# Altium PCB K601-6252双模带屏 VER 1.1 2026 10 16.PcbDoc (part 1 of 12)
Units mm, origin at the board's own origin, x right, y up, seen from the top; angles counter-clockwise.
Board outline 75.02 x 25.73 mm, 2 copper layers (Top Layer, Bottom Layer); 43 components, 67 nets, 219 pads, 157 vias.
Unrouted connection lines stored in the file: 1.
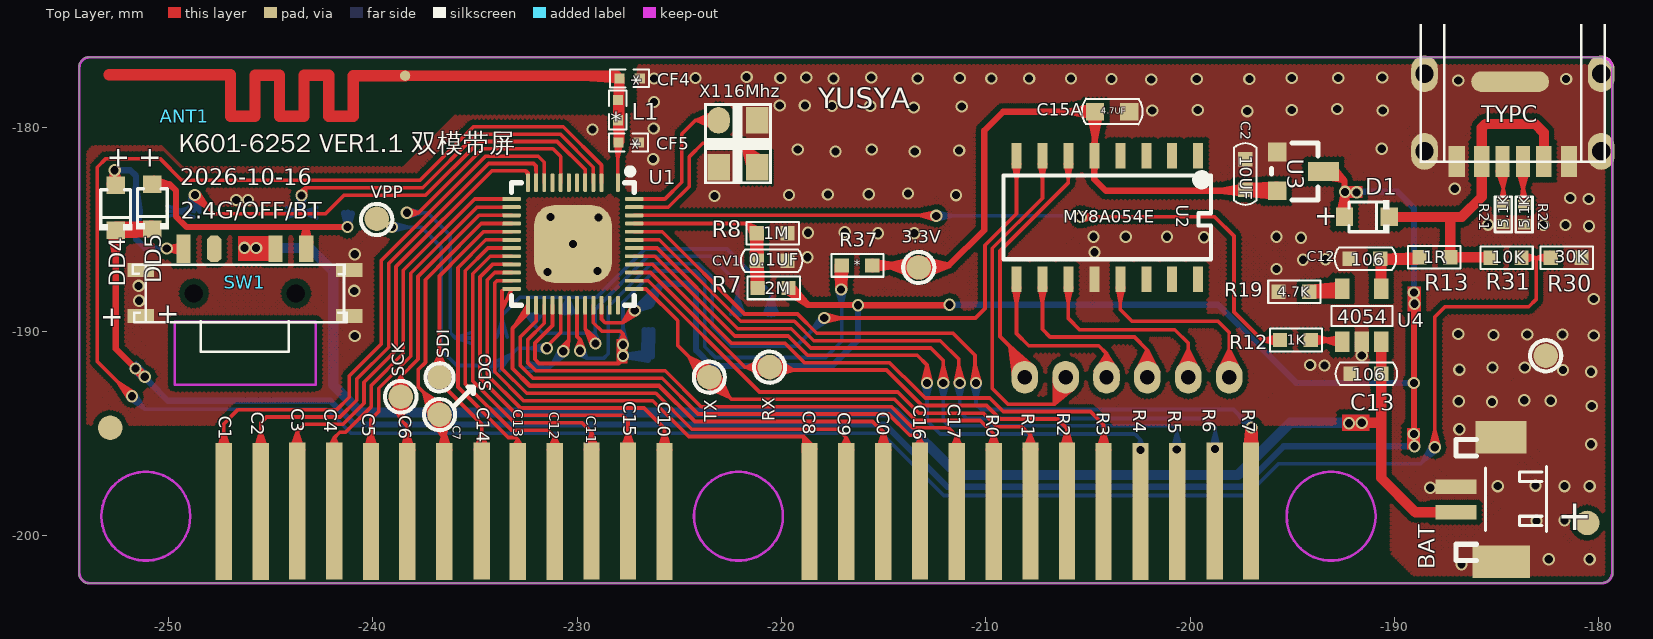
[diagram p0: Top Layer view]
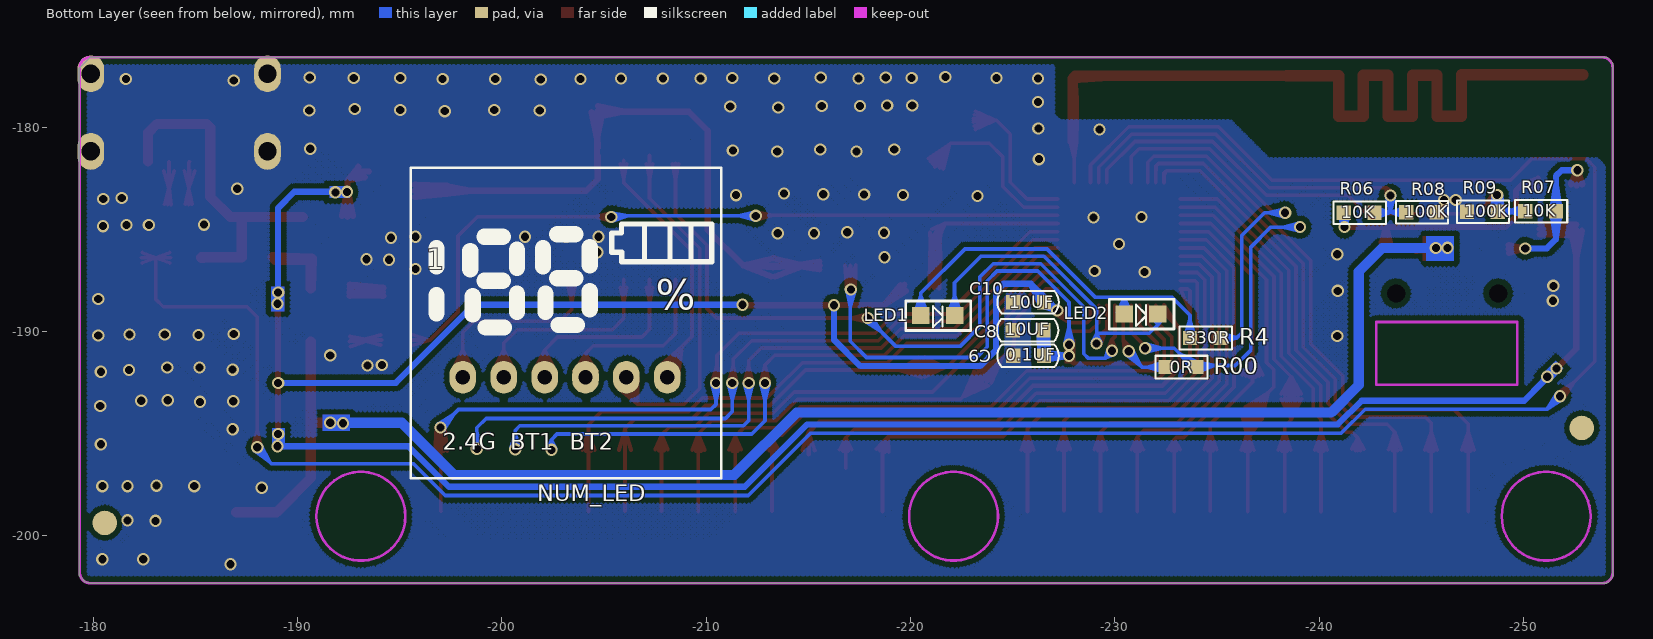
[diagram p1: Bottom Layer view, seen from below]

## Layer stack, top to bottom
Top Layer: signal copper 0.0356
Dielectric: dielectric 0.32, FR-4, Dk 4.8
Bottom Layer: signal copper 0.0356

## Board outline
-179.85,-202.316 -179.856,-202.323 -253.85,-202.323 -254.05,-202.323 -254.225,-202.148 -254.35,-202.023 -254.35,-201.148 -254.35,-176.872 -254.1,-176.623 -254.07,-176.593 -253.85,-176.593 -179.843,-176.593 -179.35,-177.086 -179.325,-177.111 -179.325,-178.964 -179.325,-201.973 -179.6,-202.248

## Design rules (kind name [scope] priority, off if disabled: settings)
Clearance GND [All] p1: gap=0.25
Clearance [All] p2: gap=0.18
PolygonConnect [All] p1: connectstyle=Direct reliefconductorwidth=0.254 reliefentries=4 polygonreliefangle="90 Angle" airgapwidth=0.254
RoutingVias [All] p1: holewidth=0.4 width=0.6 viastyle="Through Hole" minholewidth=0.4 minwidth=0.6 maxholewidth=0.4 maxwidth=0.6
SolderMaskExpansion [All] p1: expansion=0.102
Width [All] p1: maxlimit=0.5 minlimit=0.18 preferedwidth=0.5
28 further rules are at their usual default settings.

## Components (designator, comment, footprint, x,y, rotation, side; value= is the part's Value field where it differs from the comment)
* "L1" 0402 -228,-178.673 r270 bottom
* "CF4" 0402 -227.925,-177.623 r0 bottom
* "CF5" 0402 -227.975,-180.758 r0 bottom
ANT1 "Comment" ANT2 -249.2,-179.473 r270 top
BAT "$$$1" $$$1 -185.54,-198.223 r90 top
C2 "10UF" 0603CC#1 -197.3,-183.076 r270 top
C8 "10UF" 0603CC#1 -226.5,-189.948 r180 bottom
C9 "0.1UF" 0603CC#1 -226.525,-191.198 r180 bottom
C10 "10UF" 0603CC#1 -226.525,-188.573 r180 bottom
C12 "106" 0603cC -192.2,-186.448 r180 top
C13 "106" 0603cC -192.15,-192.073 r180 top
C15A "4.7UF" 0603CC#2 -202.975,-179.248 r90 top
CV1 "0.1UF" 0603CC#1 -219.7,-186.548 r0 top
D1 "SOD-323_L1.7-W1.3-LS2.7-RD" SOD-323_L1.7-W1.3-LS2.7-RD -191.35,-184.398 r180 top (schematic designator D3)
DD4 "SOD-323_L1.7-W1.3-LS2.7-RD" SOD-323_L1.7-W1.3-LS2.7-RD -252.575,-183.948 r90 top (schematic designator D3)
DD5 "SOD-323_L1.7-W1.3-LS2.7-RD" SOD-323_L1.7-W1.3-LS2.7-RD -250.775,-183.898 r90 top (schematic designator D3)
LED1 "Comment" LED0603 -222.15,-189.223 r180 bottom
LED2 "Comment" LED0603 -232.1,-189.148 r180 bottom
NUM_LED "Comment" "PCBComponent_1 - duplicate"#1 -184.406,-188.305 r180 bottom
R00 "0R" 0603RR -232.475,-191.748 r0 bottom
R4 "330R" 0603RR -233.666,-190.323 r0 bottom
R06 "10K" 0603RR -241.2,-184.198 r0 bottom
R7 "2M" 0603RR -221.15,-187.873 r180 top
R07 "10K" 0603RR -250.075,-184.123 r0 bottom
R8 "1M" 0603RR -221.2,-185.198 r180 top
R08 "100K" 0603RR -244.25,-184.173 r0 bottom
R09 "100K" 0603RR -247.225,-184.143 r0 bottom
R12 "1K" 0603RR -195.6,-190.423 r180 top
R13 "1R" 0603rR -187.275,-186.373 r0 top
R19 "4.7K" 0603RR -195.675,-188.063 r180 top
R21 "5.1K" SR0402 -184.675,-184.273 r90 top
R22 "5.1K" SR0402 -183.65,-184.282 r90 top
R30 "30K" 0603rR -182.35,-186.398 r180 top
R31 "10K" 0603rR -185.287,-186.398 r180 top
R37 "*" 0603RR -217.05,-186.773 r180 top
SW1 "SW-1P3T" SW-1P3T -246.253,-188.147 r180 top
TYPC "" USB -184.21,-179.17 r0 top locked
U1 "" QFN48-6*6 -230.2,-185.723 r0 top (schematic designator U4)
U2 "MY8A054E" SOP16L -204.05,-184.023 r270 top
U3 "SOT23" SOT23 -194.75,-182.173 r270 top
U4 "4054" SOT-23-5 -192.55,-190.498 r0 top
X1 "16Mhz" 3225 -222.125,-180.823 r90 top
? "Comment" "PCBComponent_1 - duplicate"#2 -227.18,-186.856 r0 top locked

## Footprints (in the part's own frame and the unit in brackets; to place one, negate y for a bottom-side part, rotate by r counter-clockwise, add the part's x,y. Pads: shape width x height; smd on the part's side, far side on the other; paste and mask are expansions set on the pad)
0402 [mm]
  rect 0.5x0.5 smd far side: 1(1,0) 2(0,0)
0603CC#1 [mm]
  rect 0.7x0.7 smd: 1(0,0) 2(-1.5,0)
  silkscreen extent -2.28,-0.55 0.73,0.55
0603CC#2 [mm]
  rect 0.85x0.9 smd: 1(0,0) 2(0,1.676)
  silkscreen extent -0.63,-0.66 0.64,2.32
0603cC [mm]
  rect 0.7x0.7 smd: 1(0,0) 2(-1.5,0)
  silkscreen extent -2.28,-0.55 0.73,0.55
0603RR [mm]
  rect 0.7x0.7 smd: 1(0,0) 2(-1.5,0)
  silkscreen extent -2.06,-0.55 0.5,0.55
0603rR [mm]
  rect 0.7x0.7 smd: 1(0,0) 2(-1.5,0)
  silkscreen extent -2.06,-0.55 0.5,0.55
3225 [mm]
  rect 1.3x1.1 smd: 0(-1.15,0.95) 0(1.15,-0.95) 2(-1.15,-0.95)
  oval 1.3x1.1 smd: 1(1.15,0.95)
  silkscreen extent -1.97,-1.66 2,1.66
$$$1 [mm]
  rect 0.7x2 smd: GND(0.625,1.45) VCC(-0.625,1.45)
  rect 1.6x2.8 smd: GND/2(-3.048,-0.762)
  rect 1.6x2.5 smd: GND/3(3.048,-0.762)
  silkscreen extent -2.99,-2.97 2.92,1.45
ANT2 [mm]
  Top Layer lines w0.55: -2.032,-3.7 -2.032,2.247 ; -2,2.247 0,2.247 0,3.447 -2,3.447 -2,4.647 0,4.647 0,5.847 -2,5.847 -2,7.047 0,7.047 0,8.247 -1.981,8.247 -1.981,10.791
LED0603 [mm]
  rect 0.85x0.85 smd: 1(-1.65,0) 2(0,0)
  silkscreen extent -2.39,-0.74 0.79,0.71
"PCBComponent_1 - duplicate"#1 [mm]
  oval 1.3x1.6 hole 0.7: 1(13.685,-3.937) 2(15.685,-3.937) 3(17.685,-3.937) 4(19.685,-3.937) 5(21.685,-3.937) 5(21.685,-3.937) 6(23.685,-3.937)
  silkscreen extent 11.12,-8.89 26.32,6.31
"PCBComponent_1 - duplicate"#2 [mm]
  rect 0.8x6.7 smd: 1(-20.097,-11.958) 1(-18.288,-11.958) 1(-16.51,-11.938) 1(-14.705,-11.938) 1(-12.901,-11.958) 1(-11.119,-11.958) 1(-9.313,-11.958) 1(-7.488,-11.938) 1(-5.715,-11.958) 1(-3.911,-11.958) 1(-2.107,-11.938) 1(-0.323,-11.924) 1(1.465,-11.958) 1(8.559,-11.958) 1(10.361,-11.958) 1(12.167,-11.958) 1(13.962,-11.938) 1(15.767,-11.958) 1(17.567,-11.958) 1(19.368,-11.938) 1(21.16,-11.938) 1(22.946,-11.958) 1(24.756,-11.958) 1(26.543,-11.958) 1(28.389,-11.938) 1(30.162,-11.938)
  Keep-Out Layer circle w0.127: c5.08,-12.192 r2.175
QFN48-6*6 [mm]
  rrect50% 0.19x0.9 smd paste-100 mask+0.051: 1(2.2,3) 3(1.4,3) 4(1,3) 5(0.6,3) 6(0.2,3) 7(-0.2,3) 8(-0.6,3) 9(-1,3) 10(-1.4,3) 11(-1.8,3) 12(-2.2,3) 25(-2.2,-3) 26(-1.8,-3) 27(-1.4,-3) 28(-1,-3) 29(-0.6,-3) 30(-0.2,-3) 31(0.2,-3) 32(0.6,-3) 33(1,-3) 34(1.4,-3) 35(1.8,-3) 36(2.2,-3)
  rrect50% 0.9x0.19 smd paste-100 mask+0.051: 13(-3,2.2) 14(-3,1.8) 15(-3,1.4) 16(-3,1) 17(-3,0.6) 18(-3,0.2) 19(-3,-0.2) 20(-3,-0.6) 21(-3,-1) 22(-3,-1.4) 23(-3,-1.8) 24(-3,-2.2) 37(3,-2.2) 38(3,-1.8) 39(3,-1.4) 40(3,-1) 41(3,-0.6) 42(3,-0.2) 43(3,0.2) 44(3,0.6) 45(3,1) 46(3,1.4) 47(3,1.8) 48(3,2.2)
  rrect50% 3.8x3.8 smd paste-100 mask+0.051: 49(0.001,-0.001)
  silkscreen extent -3,-3 3,3.7
SOD-323_L1.7-W1.3-LS2.7-RD [mm]
  rect 0.845x0.9 smd paste+0 mask+0.051: 1(-1.098,0) 2(1.098,0)
  silkscreen extent -1.1,-0.8 0.88,0.8
SOP16L [mm]
  rect 1.25x0.49 smd: 1(-2.625,4.445) 2(-2.625,3.175) 3(-2.625,1.905) 4(-2.625,0.635) 5(-2.625,-0.635) 6(-2.625,-1.905) 7(-2.625,-3.175) 8(-2.625,-4.445) 9(3.425,-4.445) 10(3.425,-3.175) 11(3.425,-1.905) 12(3.425,-0.635) 13(3.425,0.635) 14(3.425,1.905) 15(3.425,3.175) 16(3.425,4.445)
  silkscreen extent -1.65,-5.08 2.45,5.08
SOT23 [mil]
  rect 36x36 smd: 1(-37.5,-39) 2(37.5,-39)
  rect 36x60 smd: 3(0,50)
  silkscreen extent -55,-50 55,40
SOT-23-5 [mm]
  rect 0.7x1 smd: 1(0,0) 2(0.95,0) 3(1.9,0) 4(1.9,2.59) 5(0,2.59)
  silkscreen extent -0.54,0.75 2.46,1.75
SR0402 [mm]
  rect 0.5x0.6 smd: 1(-0.475,0) 2(0.475,0)
  silkscreen extent -0.86,-0.41 0.86,0.41
SW-1P3T [mm]
  rect 1.3x0.7 smd: 0(5.1,1.1) 0/2(-5.1,1.1) 0/3(5.1,-1.15) 0/4(-5.1,-1.15)
  rect 0.7x1.3 smd: 1(-3,-2.181) 2(-1.5,-2.181)
  oct 0.7x1.3 smd: 3(1.5,-2.181)
  rect 0.7x1.4 smd: 8(3,-2.181)
  round 0.7 hole 0.9: 9(-2.5,0) 10(2.5,0)
  silkscreen extent -4.98,-1.4 5.49,2.85
USB [mm]
  oval 1.3x1.8 hole 0.9: 1(-4.32,-2.023) 1(-4.32,1.777) 1(4.32,1.777) 1(4.32,-2.023)
  rect 0.8x1.524 smd: 1(-2.75,-2.523) 6(2.75,-2.523)
  oval 3.81x1 smd: 1(-0.129,1.391)
  rect 0.76x1.524 smd: 2(-1.52,-2.523) 5(1.52,-2.523)
  rect 0.7x1.524 smd: 3(-0.5,-2.523) 4(0.5,-2.523)
  silkscreen extent -4.5,-2.52 4.5,4.38

## Part data
U1: library part "BYC6625 QFN48"

## Free pads (board coordinates)
  round 0.5 smd: 3(-238.409,-177.491)
  round 1.2 smd far side: ""(-252.845,-194.725) ""(-180.57,-199.373) ""(-150.845,-194.962) ""(-150.845,-12.298) ""(0.755,-193.682) ""(0.775,-9.8)
  round 1.2 smd: ""(-252.845,-194.723) ""(-239.8,-184.495) ""(-238.625,-193.198) ""(-236.725,-194.075) ""(-236.725,-192.25) ""(-223.525,-192.242) ""(-220.575,-191.748) ""(-213.275,-186.873) ""(-182.6,-191.193) ""(-180.57,-199.373) ""(-150.85,-12.3) ""(-150.845,-194.977) ""(0.75,-193.684) ""(0.775,-9.8)

## Via types
v1: diameter 0.6, hole 0.4, Top Layer to Bottom Layer, tented both sides, 154 vias
v2: diameter 0.6, hole 0.4, Top Layer to Bottom Layer, 3 vias

## Nets (pads, with @x,y where several pads share a name; then routed paths per layer and width w, separated by ;. In a path a pad name is that pad's centre, name@x,y a point inside that pad or via, vN(x,y) a via of type N, cw(c..) or ccw(c..) an arc to the next point about the centre after c; other vN are vias at no path point)
2.4G: DD4.2 R07.2 SW1.8 | length 71
  Top Layer w0.305: DD4.2@-252.869,-182.809 v1(-252.625,-182.116) ; DD4.2@-252.869,-182.809 v1(-252.625,-182.116) ; DD4.2@-252.869,-182.809 v1(-252.625,-182.116) ; DD4.2@-252.869,-182.809 v1(-252.625,-182.116) ; DD4.2@-252.869,-182.809 v1(-252.625,-182.116) ; DD4.2@-252.869,-182.809 v1(-252.625,-182.116) ; DD4.2@-252.84,-182.797 v1@-252.575,-182.166 ; DD4.2@-252.84,-182.797 v1(-252.625,-182.116) ; DD4.2@-252.84,-182.797 v1@-252.575,-182.166 ; DD4.2@-252.84,-182.797 v1@-252.575,-182.166 ; DD4.2@-252.84,-182.797 v1@-252.575,-182.166 ; DD4.2@-252.84,-182.797 v1(-252.625,-182.116) ; DD4.2@-252.84,-182.797 v1(-252.625,-182.116) ; DD4.2@-252.84,-182.797 v1(-252.625,-182.116) ; DD4.2@-252.84,-182.797 v1(-252.625,-182.116) ; DD4.2@-252.84,-182.797 v1(-252.625,-182.116) ; v1(-252.625,-182.116) v1@-252.575,-182.166 ; v1(-252.625,-182.116) DD4.2@-252.575,-182.85 ; v1(-252.625,-182.116) DD4.2@-252.31,-182.797 ; v1(-252.625,-182.116) DD4.2@-252.339,-182.792 ; v1(-252.625,-182.116) DD4.2@-252.603,-182.85 ; v1(-252.625,-182.116) DD4.2@-252.339,-182.792 ; v1(-252.625,-182.116) DD4.2@-252.603,-182.85 ; v1(-252.625,-182.116) DD4.2@-252.339,-182.792 ; v1(-252.625,-182.116) DD4.2@-252.603,-182.85 ; v1(-252.625,-182.116) DD4.2@-252.575,-182.85 ; v1(-252.625,-182.116) DD4.2@-252.31,-182.797 ; v1(-252.625,-182.116) DD4.2@-252.31,-182.797 ; v1(-252.625,-182.116) DD4.2@-252.31,-182.797 ; v1(-252.625,-182.116) DD4.2@-252.575,-182.85 ; v1(-252.625,-182.116) DD4.2@-252.31,-182.797 ; v1(-252.625,-182.116) DD4.2@-252.575,-182.85 ; DD4.2@-252.575,-182.85 v1@-252.575,-182.166 ; DD4.2@-252.575,-182.85 v1@-252.575,-182.166 ; DD4.2@-252.575,-182.85 v1@-252.575,-182.166 ; v1@-252.575,-182.166 DD4.2@-252.31,-182.797 ; v1@-252.575,-182.166 DD4.2@-252.31,-182.797 ; v1@-252.575,-182.166 DD4.2@-252.31,-182.797 ; v1@-252.575,-182.166 DD4.2@-252.31,-182.797 ; v1(-250.075,-185.939) -249.28,-185.939 SW1.8@-249.253,-185.966 ; v1(-250.075,-185.939) SW1.8@-249.283,-186.161 ; v1(-250.075,-185.939) SW1.8@-249.27,-185.769 ; v1(-250.075,-185.939) SW1.8@-249.253,-185.966 ; v1(-250.075,-185.939) SW1.8@-249.283,-186.161 ; v1(-250.075,-185.939) SW1.8@-249.27,-185.769 ; v1(-250.075,-185.939) SW1.8@-249.253,-185.966 ; v1(-250.075,-185.939) SW1.8@-249.283,-186.161 ; v1(-250.075,-185.939) SW1.8@-249.27,-185.769 ; v1(-250.075,-185.939) SW1.8@-249.253,-185.966 ; v1(-250.075,-185.939) SW1.8@-249.283,-186.161 ; v1(-250.075,-185.939) SW1.8@-249.27,-185.769 ; v1(-250.075,-185.939) SW1.8@-249.253,-185.966 ; v1(-250.075,-185.939) SW1.8@-249.283,-186.161 ; v1(-250.075,-185.939) SW1.8@-249.27,-185.769
  Bottom Layer w0.305: v1(-252.625,-182.116) -251.857,-182.116 -251.575,-182.398 R07.2@-251.575,-184.123 ; v1(-250.075,-185.939) -251.134,-185.939 -251.575,-185.498 R07.2@-251.575,-184.123 ; R07.2@-251.772,-184.138 -251.575,-185.387 ; R07.2@-251.772,-184.138 -251.575,-185.387 ; R07.2@-251.772,-184.138 -251.575,-185.387 ; R07.2@-251.772,-184.138 -251.575,-185.387 ; R07.2@-251.772,-184.107 -251.575,-182.858 ; R07.2@-251.772,-184.107 -251.575,-182.858 ; R07.2@-251.772,-184.107 -251.575,-182.858 ; R07.2@-251.772,-184.107 -251.575,-182.858 ; -251.575,-185.387 R07.2@-251.378,-184.138 ; -251.575,-185.387 R07.2@-251.378,-184.138 ; -251.575,-185.387 R07.2@-251.378,-184.138 ; -251.575,-185.387 R07.2@-251.575,-184.123 ; -251.575,-185.387 R07.2@-251.378,-184.138 ; -251.575,-185.387 R07.2@-251.575,-184.123 ; R07.2@-251.575,-184.123 -251.575,-182.858 ; R07.2@-251.575,-184.123 -251.575,-182.858 ; -251.575,-182.858 R07.2@-251.378,-184.107 ; -251.575,-182.858 R07.2@-251.378,-184.107 ; -251.575,-182.858 R07.2@-251.378,-184.107 ; -251.575,-182.858 R07.2@-251.378,-184.107
"5V LVD": R30.1 R31.2 U1.3 | length 179
  Top Layer w0.18: U1.3@-228.8,-182.723 -228.8,-181.864 ; -252.454,-192.491 v1@-251.936,-193.304 ; -252.454,-192.491 v1@-251.641,-193.009 ; -252.454,-192.491 v1@-251.936,-193.304 ; -252.454,-192.491 v1@-251.641,-193.009 ; -252.454,-192.491 v1(-251.773,-193.173) ; -252.454,-192.491 v1@-251.936,-193.304 ; -252.454,-192.491 v1@-251.641,-193.009 ; -252.454,-192.491 v1(-251.773,-193.173) ; -252.454,-192.491 v1@-251.936,-193.304 ; -252.454,-192.491 v1@-251.641,-193.009 ; v1(-251.773,-193.173) -253.475,-191.47 -253.475,-181.973 -253.049,-181.546 -250.404,-181.546 -249.337,-182.613 -237.695,-182.613 -235.07,-179.988 -230.676,-179.988 -228.8,-181.864 ; U1.3@-228.8,-182.368 -228.8,-181.864 ; U1.3@-228.8,-182.368 -228.8,-181.864 ; U1.3@-228.8,-182.368 -228.8,-181.864 ; v1@-188.233,-195.646 -188.025,-194.833 ; v1@-188.233,-195.646 -188.025,-194.833 ; v1@-188.233,-195.646 -188.025,-194.833 ; v1@-188.233,-195.646 -188.025,-194.833 ; v1(-188.025,-195.673) -188.025,-189.298 -187.525,-188.798 -183.425,-188.798 -183.069,-188.441 -183.069,-186.398 ; v1(-188.025,-195.673) -188.025,-194.833 ; v1(-188.025,-195.673) -188.025,-194.833 ; -188.025,-194.833 v1@-187.817,-195.646 ; -188.025,-194.833 v1@-187.817,-195.646 ; -188.025,-194.833 v1@-187.817,-195.646 ; -188.025,-194.833 v1@-187.817,-195.646 ; R31.2@-183.787,-186.398 -183.069,-186.398 ; R31.2@-183.787,-186.398 -183.069,-186.398 ; R31.2@-183.787,-186.398 -183.069,-186.398 ; R31.2@-183.74,-186.653 -183.069,-186.398 ; R31.2@-183.74,-186.653 -183.069,-186.398 ; R31.2@-183.74,-186.653 -183.069,-186.398 ; R31.2@-183.74,-186.653 -183.069,-186.398 ; R31.2@-183.74,-186.142 -183.069,-186.398 ; R31.2@-183.74,-186.142 -183.069,-186.398 ; R31.2@-183.74,-186.142 -183.069,-186.398 ; R31.2@-183.74,-186.142 -183.069,-186.398 ; -183.069,-186.398 R30.1@-182.35,-186.398 ; -183.069,-186.398 R30.1@-182.397,-186.653 ; -183.069,-186.398 R30.1@-182.397,-186.142 ; -183.069,-186.398 R30.1@-182.397,-186.653 ; -183.069,-186.398 R30.1@-182.397,-186.142 ; -183.069,-186.398 R30.1@-182.397,-186.653 ; -183.069,-186.398 R30.1@-182.397,-186.142 ; -183.069,-186.398 R30.1@-182.35,-186.398 ; -183.069,-186.398 R30.1@-182.397,-186.653 ; -183.069,-186.398 R30.1@-182.397,-186.142 ; -183.069,-186.398 R30.1@-182.35,-186.398
  Bottom Layer w0.18: v1@-251.903,-193.337 -251.132,-193.813 ; v1@-251.903,-193.337 -251.132,-193.813 ; v1@-251.903,-193.337 -251.132,-193.813 ; v1@-251.903,-193.337 -251.132,-193.813 ; v1(-251.773,-193.173) -251.132,-193.813 ; v1(-251.773,-193.173) -251.132,-193.813 ; v1(-251.773,-193.173) -251.132,-193.813 ; v1@-251.608,-193.042 -251.132,-193.813 ; v1@-251.608,-193.042 -251.132,-193.813 ; v1@-251.608,-193.042 -251.132,-193.813 ; v1@-251.608,-193.042 -251.132,-193.813 ; -251.132,-193.813 -242.239,-193.813 -241.075,-194.977 -215.11,-194.977 -212.06,-198.027 -197.234,-198.027 -195.679,-196.473 -188.725,-196.473 -188.025,-195.773 v1(-188.025,-195.673) ; -188.64,-196.388 v1@-187.882,-195.826 ; -188.64,-196.388 v1@-188.199,-195.554 ; -188.64,-196.388 v1(-188.025,-195.673) ; -188.64,-196.388 v1@-187.882,-195.826 ; -188.64,-196.388 v1@-188.199,-195.554 ; -188.64,-196.388 v1(-188.025,-195.673) ; -188.64,-196.388 v1@-187.882,-195.826 ; -188.64,-196.388 v1@-188.199,-195.554 ; -188.64,-196.388 v1(-188.025,-195.673) ; -188.64,-196.388 v1@-187.882,-195.826 ; -188.64,-196.388 v1@-188.199,-195.554 ; -188.64,-196.388 v1(-188.025,-195.673) ; -188.635,-196.382 v1@-187.882,-195.827 ; -188.635,-196.382 v1@-188.199,-195.554 ; -188.635,-196.382 v1(-188.025,-195.673)
"54E CTRL": U1.31 U2.8 | length 88.1
  Top Layer w0.18: U1.31@-230,-188.723 -230,-190.248 -229.85,-190.398 ; v1@-229.85,-190.923 -229.85,-190.398 ; U2.8@-208.495,-181.923 -208.495,-184.243 -210.035,-185.783 -210.035,-188.883 -210.5,-189.348 v1(-217.9,-189.348) ; v1@-230.056,-190.908 -229.85,-190.398 ; v1@-230.056,-190.908 -229.85,-190.398 ; v1@-230.056,-190.908 -229.85,-190.398 ; v1@-230.056,-190.908 -229.85,-190.398 ; v1@-230.056,-190.908 -229.85,-190.398 ; -230,-189.713 U1.31@-230,-189.078 ; -230,-189.713 U1.31@-230,-189.078 ; -230,-189.713 U1.31@-230,-189.078 ; v1(-229.85,-190.948) -229.85,-190.398 ; v1(-229.85,-190.948) -229.85,-190.398 ; v1(-229.85,-190.948) -229.85,-190.398 ; v1(-229.85,-190.948) -229.85,-190.398 ; -229.85,-190.398 v1@-229.644,-190.908 ; -229.85,-190.398 v1@-229.644,-190.908 ; -229.85,-190.398 v1@-229.644,-190.908 ; -229.85,-190.398 v1@-229.644,-190.908 ; -229.85,-190.398 v1@-229.644,-190.908 ; v1(-217.9,-189.348) -217.06,-189.348 ; v1(-217.9,-189.348) -217.06,-189.348 ; v1@-217.874,-189.556 -217.06,-189.348 ; v1@-217.874,-189.556 -217.06,-189.348 ; v1@-217.874,-189.556 -217.06,-189.348 ; v1@-217.874,-189.556 -217.06,-189.348 ; v1@-217.874,-189.139 -217.06,-189.348 ; v1@-217.874,-189.139 -217.06,-189.348 ; v1@-217.874,-189.139 -217.06,-189.348 ; v1@-217.874,-189.139 -217.06,-189.348 ; U2.8@-208.649,-181.793 -208.495,-182.563 ; U2.8@-208.649,-181.793 -208.495,-182.563 ; U2.8@-208.649,-181.793 -208.495,-182.563 ; U2.8@-208.649,-181.793 -208.495,-182.563 ; U2.8@-208.649,-181.793 -208.495,-182.563 ; -208.495,-182.563 U2.8@-208.341,-181.793 ; -208.495,-182.563 U2.8@-208.495,-181.778 ; -208.495,-182.563 U2.8@-208.341,-181.793 ; -208.495,-182.563 U2.8@-208.495,-181.778 ; -208.495,-182.563 U2.8@-208.341,-181.793 ; -208.495,-182.563 U2.8@-208.495,-181.778 ; -208.495,-182.563 U2.8@-208.341,-181.793 ; -208.495,-182.563 U2.8@-208.495,-181.778 ; -208.495,-182.563 U2.8@-208.341,-181.793 ; -208.495,-182.563 U2.8@-208.495,-181.778
  Bottom Layer w0.18: v1@-229.85,-190.998 -229.525,-191.323 ; v1@-229.976,-191.116 -229.525,-191.323 ; v1@-229.976,-191.116 -229.525,-191.323 ; v1@-229.976,-191.116 -229.525,-191.323 ; v1@-229.976,-191.116 -229.525,-191.323 ; v1@-229.976,-191.116 -229.525,-191.323 ; v1(-229.85,-190.948) -229.525,-191.323 ; v1(-229.85,-190.948) -229.525,-191.323 ; v1(-229.85,-190.948) -229.525,-191.323 ; v1(-229.85,-190.948) -229.525,-191.323 ; v1@-229.666,-190.847 -229.525,-191.323 ; v1@-229.666,-190.847 -229.525,-191.323 ; v1@-229.666,-190.847 -229.525,-191.323 ; v1@-229.666,-190.847 -229.525,-191.323 ; v1@-229.666,-190.847 -229.525,-191.323 ; -229.525,-191.323 -228.7,-191.323 -228.475,-191.098 -228.475,-188.791 -226.372,-186.688 -224.042,-186.688 -223.375,-187.354 -223.375,-189.773 -222.413,-190.734 -219.287,-190.734 v1(-217.9,-189.348) ; -218.582,-190.029 v1@-217.769,-189.511 ; -218.582,-190.029 v1@-218.064,-189.216 ; -218.582,-190.029 v1(-217.9,-189.348) ; -218.582,-190.029 v1@-217.769,-189.511 ; -218.582,-190.029 v1@-218.064,-189.216 ; -218.582,-190.029 v1(-217.9,-189.348) ; -218.582,-190.029 v1@-217.769,-189.511 ; -218.582,-190.029 v1@-218.064,-189.216 ; -218.582,-190.029 v1(-217.9,-189.348) ; -218.582,-190.029 v1@-217.769,-189.511 ; -218.582,-190.029 v1@-218.064,-189.216 ; -218.582,-190.029 v1(-217.9,-189.348) ; -218.582,-190.029 v1@-217.769,-189.511 ; -218.582,-190.029 v1@-218.064,-189.216 ; -218.582,-190.029 v1(-217.9,-189.348)
$$$1: LED1.1 LED2.1 R4.1 | length 76.8
  Bottom Layer w0.18: R4.1@-233.923,-190.285 -233.666,-189.433 ; R4.1@-233.923,-190.285 -233.666,-189.433 ; R4.1@-233.923,-190.285 -233.666,-189.433 ; R4.1@-233.923,-190.285 -233.666,-189.433 ; R4.1@-233.666,-190.323 -233.666,-189.215 -232.773,-188.323 -230.475,-188.323 ; R4.1@-233.666,-190.323 -233.666,-189.433 ; R4.1@-233.666,-190.323 -233.666,-189.433 ; -233.666,-189.433 R4.1@-233.408,-190.285 ; -233.666,-189.433 R4.1@-233.408,-190.285 ; -233.666,-189.433 R4.1@-233.408,-190.285 ; -233.666,-189.433 R4.1@-233.408,-190.285 ; LED2.1@-230.778,-189.077 -230.45,-188.348 ; LED2.1@-230.778,-189.077 -230.45,-188.348 ; LED2.1@-230.778,-189.077 -230.45,-188.348 ; LED2.1@-230.778,-189.077 -230.45,-188.348 ; LED2.1@-230.778,-189.077 -230.45,-188.348 ; LED2.1@-230.778,-189.077 -230.45,-188.348 ; LED2.1@-230.604,-189.133 -230.45,-188.348 ; LED2.1@-230.604,-189.133 -230.45,-188.348 ; LED2.1@-230.604,-189.133 -230.45,-188.348 ; LED2.1@-230.604,-189.133 -230.45,-188.348 ; LED2.1@-230.604,-189.133 -230.45,-188.348 ; LED2.1@-230.604,-189.133 -230.45,-188.348 ; -230.475,-188.323 -229.025,-188.323 -226.67,-185.968 -222.655,-185.968 -220.5,-188.123 LED1.1@-220.5,-189.223 ; -230.475,-188.323 -230.45,-188.348 ; LED2.1@-230.45,-189.148 -230.45,-188.348 ; LED2.1@-230.45,-189.148 -230.45,-188.348 ; LED2.1@-230.45,-189.148 -230.45,-188.348 ; LED2.1@-230.45,-189.148 -230.45,-188.348 ; LED2.1@-230.45,-189.148 -230.45,-188.348 ; -230.45,-188.348 LED2.1@-230.122,-189.077 ; -230.45,-188.348 LED2.1@-230.296,-189.133 ; -230.45,-188.348 LED2.1@-230.122,-189.077 ; -230.45,-188.348 LED2.1@-230.296,-189.133 ; -230.45,-188.348 LED2.1@-230.122,-189.077 ; -230.45,-188.348 LED2.1@-230.296,-189.133 ; -230.45,-188.348 LED2.1@-230.122,-189.077 ; -230.45,-188.348 LED2.1@-230.296,-189.133 ; -230.45,-188.348 LED2.1@-230.122,-189.077 ; -230.45,-188.348 LED2.1@-230.296,-189.133 ; -230.45,-188.348 LED2.1@-230.122,-189.077 ; -230.45,-188.348 LED2.1@-230.296,-189.133 ; LED1.1@-220.83,-189.164 -220.5,-188.258 ; LED1.1@-220.83,-189.164 -220.5,-188.258 ; LED1.1@-220.83,-189.164 -220.5,-188.258 ; LED1.1@-220.83,-189.164 -220.5,-188.258 ; LED1.1@-220.83,-189.164 -220.5,-188.258 ; LED1.1@-220.83,-189.164 -220.5,-188.258 ; LED1.1@-220.655,-189.21 -220.5,-188.258 ; LED1.1@-220.655,-189.21 -220.5,-188.258 ; LED1.1@-220.655,-189.21 -220.5,-188.258 ; LED1.1@-220.655,-189.21 -220.5,-188.258 ; LED1.1@-220.655,-189.21 -220.5,-188.258 ; LED1.1@-220.655,-189.21 -220.5,-188.258 ; LED1.1@-220.5,-189.223 -220.5,-188.258 ; LED1.1@-220.5,-189.223 -220.5,-188.258 ; LED1.1@-220.5,-189.223 -220.5,-188.258 ; LED1.1@-220.5,-189.223 -220.5,-188.258 ; -220.5,-188.258 LED1.1@-220.17,-189.164 ; -220.5,-188.258 LED1.1@-220.346,-189.21 ; -220.5,-188.258 LED1.1@-220.17,-189.164 ; -220.5,-188.258 LED1.1@-220.346,-189.21 ; -220.5,-188.258 LED1.1@-220.17,-189.164 ; -220.5,-188.258 LED1.1@-220.346,-189.21 ; -220.5,-188.258 LED1.1@-220.17,-189.164 ; -220.5,-188.258 LED1.1@-220.346,-189.21 ; -220.5,-188.258 LED1.1@-220.17,-189.164 ; -220.5,-188.258 LED1.1@-220.346,-189.21 ; -220.5,-188.258 LED1.1@-220.17,-189.164 ; -220.5,-188.258 LED1.1@-220.346,-189.21
+5V: C12.2 R13.2 U4.4 | length 38.3
  Top Layer w0.5: R13.2@-188.851,-186.376 C12.2@-190.7,-186.448 ; R13.2@-188.847,-186.377 C12.2@-190.7,-186.448 ; C12.2@-190.7,-186.448 U4.4@-190.65,-187.908 ; C12.2@-190.7,-186.448 R13.2@-188.9,-186.498 ; C12.2@-190.7,-186.448 U4.4@-190.65,-187.758 ; C12.2@-190.7,-186.448 U4.4@-190.65,-187.908 ; C12.2@-190.7,-186.448 U4.4@-190.65,-187.758 ; C12.2@-190.7,-186.448 R13.2@-188.9,-186.498 ; C12.2@-190.7,-186.448 U4.4@-190.65,-187.758 ; C12.2@-190.7,-186.448 U4.4@-190.65,-187.758 ; C12.2@-190.7,-186.448 U4.4@-190.65,-187.758 ; C12.2@-190.7,-186.448 U4.4@-190.65,-187.758 ; C12.2@-190.65,-186.449 R13.2@-188.775,-186.373 ; C12.2@-190.65,-186.449 R13.2@-188.775,-186.373 ; C12.2@-190.65,-186.449 R13.2@-188.775,-186.373 ; U4.4@-190.65,-187.908 C12.2@-190.65,-186.498 ; U4.4@-190.65,-187.758 C12.2@-190.65,-186.498 ; U4.4@-190.65,-187.758 C12.2@-190.65,-186.498 ; U4.4@-190.65,-187.758 C12.2@-190.65,-186.498 ; C12.2@-190.65,-186.498 R13.2@-188.9,-186.498 ; R13.2@-188.9,-186.498 R13.2@-188.775,-186.373 ; R13.2@-188.775,-186.373 -190.647,-186.498 R13.2@-188.775,-186.373 ; R13.2@-188.775,-186.373 -190.624,-186.445 R13.2@-188.775,-186.373
A5: R22.2 TYPC.4 | length 27.1
  Top Layer w0.18: TYPC.4@-183.71,-181.693 -183.71,-183.563 R22.2@-183.5,-183.773 ; TYPC.4@-183.967,-182.143 -183.71,-182.995 ; TYPC.4@-183.967,-182.143 -183.71,-182.995 ; TYPC.4@-183.967,-182.143 -183.71,-182.995 ; TYPC.4@-183.967,-182.143 -183.71,-182.995 ; TYPC.4@-183.967,-182.143 -183.71,-182.995 ; R22.2@-183.81,-183.803 -183.71,-182.97 ; R22.2@-183.81,-183.803 -183.71,-182.97 ; R22.2@-183.81,-183.803 -183.711,-182.985 ; -183.711,-182.985 -183.492,-183.779 -183.706,-183.018 -183.81,-183.802 -183.706,-182.984 ; -183.711,-182.985 R22.2@-183.65,-183.807 ; -183.71,-182.995 TYPC.4@-183.452,-182.143 ; -183.71,-182.995 TYPC.4@-183.71,-182.105 ; -183.71,-182.995 TYPC.4@-183.452,-182.143 ; -183.71,-182.995 TYPC.4@-183.71,-182.105 ; -183.71,-182.995 TYPC.4@-183.452,-182.143 ; -183.71,-182.995 TYPC.4@-183.71,-182.105 ; -183.71,-182.995 TYPC.4@-183.452,-182.143 ; -183.71,-182.995 TYPC.4@-183.71,-182.105 ; -183.71,-182.995 TYPC.4@-183.452,-182.143 ; -183.71,-182.995 TYPC.4@-183.71,-182.105 ; -183.71,-182.97 R22.2@-183.492,-183.78 ; -183.71,-182.97 R22.2@-183.65,-183.807 ; -183.71,-182.97 R22.2@-183.492,-183.78 ; -183.71,-182.97 R22.2@-183.65,-183.807 ; -183.706,-182.984 R22.2@-183.492,-183.781 ; -183.706,-182.984 R22.2@-183.65,-183.807
ANT: *.1@-228,-179.673 *.2 pad.3 U1.1 | length 88.6
  Top Layer w0.18: U1.1@-228,-182.723 -228,-180.783 *.2@-227.975,-180.758 ; *.2@-228.135,-180.769 -228,-181.549 ; *.2@-228.135,-180.769 -228,-181.549 ; *.2@-228.135,-180.769 -228,-181.549 ; *.2@-228.135,-180.769 -228,-181.549 ; *.2@-228.135,-180.769 -228,-181.547 *.2@-227.816,-180.779 ; U1.1@-228,-182.368 -228,-181.733 ; U1.1@-228,-182.368 -228,-181.733 ; U1.1@-228,-182.368 -228,-181.733 ; -228,-181.549 *.2@-227.816,-180.779 ; -228,-181.549 *.2@-227.975,-180.758 ; -228,-181.549 *.2@-227.816,-180.779 ; -228,-181.549 *.2@-227.975,-180.758 ; -228,-181.549 *.2@-227.816,-180.779 ; -228,-181.549 *.2@-227.975,-180.758 ; -228,-181.549 *.2@-227.816,-180.779 ; -228,-181.549 *.2@-227.975,-180.758
  Top Layer w0.5: pad.3@-238.409,-177.491 -228.056,-177.491 *.2@-227.925,-177.623 ; *.1@-228,-179.673 -227.925,-177.914 ; *.1@-228,-179.673 *.2@-227.925,-180.708 ; *.1@-228,-179.673 -227.925,-179.002 ; *.1@-228,-179.673 *.2@-227.975,-180.758 ; *.1@-228,-179.673 *.2@-228,-178.673 ; *.1@-228,-179.673 *.2@-228,-178.673 ; *.1@-228,-179.673 *.2@-227.975,-180.758 ; *.1@-228,-179.673 -227.925,-177.914 ; *.1@-228,-179.673 *.2@-227.925,-180.708 ; *.1@-228,-179.673 -227.925,-179.002 ; *.1@-228,-179.673 *.2@-227.975,-180.758 ; *.1@-228,-179.673 -227.925,-180.431 ; *.1@-228,-179.673 *.2@-228,-178.673 ; *.1@-228,-179.673 *.2@-227.975,-180.758 ; *.1@-228,-179.673 *.2@-228,-178.673 ; *.1@-228,-179.673 -227.925,-179.002 ; *.1@-228,-179.673 *.2@-227.975,-180.758 ; *.1@-228,-179.673 *.2@-227.975,-180.758 ; *.1@-228,-179.673 *.2@-228,-178.673 ; *.1@-228,-179.673 -227.936,-177.924 *.2@-228,-178.673 ; *.1@-228,-179.673 -227.987,-179.372 ; *.1@-228,-179.673 *.2@-228,-178.673 ; *.1@-228,-179.673 *.2@-228,-178.673 ; *.1@-228,-179.673 *.2@-228,-178.673 ; *.1@-228,-179.673 *.2@-228,-178.673 ; *.1@-228,-179.673 *.2@-228,-178.673 ; *.1@-228,-179.673 *.2@-228,-178.673 ; *.2@-228,-178.673 *.2@-227.925,-177.623 ; *.2@-228,-178.673 -227.925,-180.431 ; *.2@-228,-178.673 -227.925,-179.002 ; *.2@-228,-178.673 *.2@-227.975,-180.758 ; *.2@-228,-178.673 -227.925,-177.914 ; *.2@-228,-178.673 -227.925,-179.002 ; *.2@-228,-178.673 *.2@-227.975,-180.758 ; *.2@-228,-178.673 *.2@-227.925,-177.623 ; *.2@-228,-178.673 *.2@-227.925,-177.623 ; *.2@-228,-178.673 -227.925,-180.431 ; *.2@-228,-178.673 -227.925,-179.002 ; *.2@-228,-178.673 *.2@-227.975,-180.758 ; *.2@-228,-178.673 -227.925,-177.914 ; *.2@-228,-178.673 -227.925,-179.002 ; *.2@-228,-178.673 -227.925,-179.002 ; *.2@-228,-178.673 *.2@-227.975,-180.758 ; *.2@-228,-178.673 *.2@-227.925,-177.623 ; *.2@-228,-178.673 -227.987,-179.372 ; *.2@-228,-178.673 -227.925,-177.914 ; *.2@-228,-178.673 -227.925,-179.002 ; *.2@-228,-178.673 -227.925,-179.002 ; -227.987,-179.372 *.2@-227.925,-177.623 ; *.2@-227.975,-180.758 *.2@-227.925,-180.708 ; *.2@-227.975,-180.758 -227.925,-179.002 ; *.2@-227.975,-180.758 -227.925,-179.002 ; *.2@-227.975,-180.758 -227.925,-180.431 ; *.2@-227.925,-180.708 *.2@-227.925,-177.623 ; -227.925,-177.914 *.2@-227.925,-177.623 ; -227.925,-177.914 *.2@-227.925,-177.623 ; *.2@-227.925,-177.623 -229.731,-177.491 *.2@-227.925,-177.623
B5: R21.2 TYPC.3 | length 23.4
  Top Layer w0.18: TYPC.3@-184.71,-181.693 -184.675,-181.727 R21.2@-184.675,-183.798 ; TYPC.3@-184.965,-182.152 -184.675,-182.995 ; TYPC.3@-184.965,-182.152 -184.675,-182.995 ; TYPC.3@-184.965,-182.152 -184.675,-182.995 ; TYPC.3@-184.965,-182.152 -184.675,-182.995 ; TYPC.3@-184.965,-182.152 -184.675,-182.995 ; R21.2@-184.834,-183.781 -184.675,-183.008 ; R21.2@-184.834,-183.781 -184.675,-183.008 ; R21.2@-184.834,-183.781 -184.675,-183.008 ; R21.2@-184.834,-183.781 -184.675,-183.008 ; TYPC.3@-184.71,-182.105 -184.675,-182.995 ; TYPC.3@-184.71,-182.105 -184.675,-182.995 ; TYPC.3@-184.71,-182.105 -184.675,-182.995 ; TYPC.3@-184.71,-182.105 -184.675,-182.995 ; TYPC.3@-184.71,-182.105 -184.675,-182.995 ; R21.2@-184.675,-183.798 -184.675,-183.008 ; R21.2@-184.675,-183.798 -184.675,-183.008 ; -184.675,-183.008 R21.2@-184.516,-183.781 ; -184.675,-183.008 R21.2@-184.516,-183.781 ; -184.675,-183.008 R21.2@-184.516,-183.781 ; -184.675,-183.008 R21.2@-184.516,-183.781 ; -184.675,-182.995 TYPC.3@-184.451,-182.133 ; -184.675,-182.995 TYPC.3@-184.451,-182.133 ; -184.675,-182.995 TYPC.3@-184.451,-182.133 ; -184.675,-182.995 TYPC.3@-184.451,-182.133 ; -184.675,-182.995 TYPC.3@-184.451,-182.133
BAT+: BAT.VCC C13.2 SW1.2 U4.3 | length 92.3
  Top Layer w0.5: v1(-191.6,-194.473) -190.675,-194.473 -190.65,-194.448 ; U4.3@-190.65,-190.498 -190.65,-194.448 ; BAT.VCC@-186.99,-198.848 -188.975,-198.848 ; v1(-245.7,-185.923) -244.796,-185.923 SW1.2@-244.753,-185.966 ; v1(-245.7,-185.923) SW1.2@-244.753,-185.966 ; v1(-245.7,-185.923) SW1.2@-244.753,-185.966 ; -190.65,-194.448 -190.65,-197.173 -188.975,-198.848 ; -190.65,-192.498 U4.3@-190.65,-190.648 ; -190.65,-192.498 U4.3@-190.65,-190.648 ; -190.65,-192.498 U4.3@-190.65,-190.648 ; -188.975,-198.848 BAT.VCC@-187.64,-198.848 ; -188.975,-198.848 BAT.VCC@-187.64,-198.848 ; -188.975,-198.848 BAT.VCC@-187.64,-198.848
  Bottom Layer w0.5: v1(-245.7,-185.923) -243.075,-185.923 -241.925,-187.073 -241.925,-192.623 -240.575,-193.973 -214.425,-193.973 -211.375,-197.023 -197.65,-197.023 -195.1,-194.473 v1(-191.6,-194.473) ; v1(-192.225,-194.498) v1(-191.6,-194.473) ; v1(-192.225,-194.498) -194.026,-194.473 v1(-192.225,-194.498) ; v1(-192.225,-194.498) v1(-191.6,-194.473)
  other v1: -246.275,-185.913
BT: DD5.2 R06.1 SW1.1 | length 58.6
  Top Layer w0.305: DD5.2@-250.775,-182.8 -249.94,-182.8 ; SW1.1@-243.253,-185.966 -243.253,-184.89 ; v1(-241.225,-184.888) -243.255,-184.888 ; DD5.2@-250.748,-182.8 -249.94,-182.8 ; DD5.2@-250.748,-182.8 -249.94,-182.8 ; DD5.2@-250.748,-182.8 -249.94,-182.8 ; DD5.2@-250.748,-182.8 -249.94,-182.8 ; DD5.2@-250.748,-182.8 -249.94,-182.8 ; DD5.2@-250.702,-183.066 -249.94,-182.8 ; DD5.2@-250.702,-183.066 -249.94,-182.8 ; DD5.2@-250.702,-183.066 -249.94,-182.8 ; DD5.2@-250.702,-183.066 -249.94,-182.8 ; DD5.2@-250.702,-183.066 -249.94,-182.8 ; DD5.2@-250.702,-182.534 -249.94,-182.8 ; DD5.2@-250.702,-182.534 -249.94,-182.8 ; DD5.2@-250.702,-182.534 -249.94,-182.8 ; DD5.2@-250.702,-182.534 -249.94,-182.8 ; DD5.2@-250.702,-182.534 -249.94,-182.8 ; -249.94,-182.8 -249.618,-183.123 -249.618,-184.38 -249.11,-184.888 -243.255,-184.888 ; SW1.1@-243.449,-185.641 -243.253,-184.89 ; SW1.1@-243.449,-185.641 -243.253,-184.89 ; SW1.1@-243.449,-185.641 -243.253,-184.89 ; SW1.1@-243.449,-185.641 -243.253,-184.89 ; SW1.1@-243.449,-185.641 -243.253,-184.89 ; -243.255,-184.888 -243.253,-184.89 ; SW1.1@-243.253,-185.666 -243.253,-184.89 ; SW1.1@-243.253,-185.666 -243.253,-184.89 ; SW1.1@-243.253,-185.666 -243.253,-184.89 ; SW1.1@-243.253,-185.666 -243.253,-184.89 ; SW1.1@-243.253,-185.666 -243.253,-184.89 ; -243.253,-184.89 SW1.1@-243.057,-185.641 ; -243.253,-184.89 SW1.1@-243.057,-185.641 ; -243.253,-184.89 SW1.1@-243.057,-185.641 ; -243.253,-184.89 SW1.1@-243.057,-185.641 ; -243.253,-184.89 SW1.1@-243.057,-185.641
  Bottom Layer w0.18: R06.1@-241.2,-184.198 R06.1@-241.175,-184.223
  Bottom Layer w0.305: R06.1@-241.397,-184.219 v1(-241.225,-184.888) ; R06.1@-241.397,-184.219 v1(-241.225,-184.888) ; R06.1@-241.397,-184.219 v1(-241.225,-184.888) ; R06.1@-241.395,-184.227 v1@-241.2,-184.863 ; R06.1@-241.395,-184.227 v1(-241.225,-184.888) ; R06.1@-241.395,-184.227 v1@-241.2,-184.863 ; R06.1@-241.395,-184.227 v1@-241.2,-184.863 ; R06.1@-241.395,-184.227 v1@-241.2,-184.863 ; R06.1@-241.395,-184.227 v1(-241.225,-184.888) ; R06.1@-241.395,-184.227 v1(-241.225,-184.888) ; R06.1@-241.395,-184.227 v1(-241.225,-184.888) ; R06.1@-241.395,-184.227 v1(-241.225,-184.888) ; v1(-241.225,-184.888) v1@-241.2,-184.863 ; v1(-241.225,-184.888) R06.1@-241.2,-184.198 ; v1(-241.225,-184.888) R06.1@-241.005,-184.227 ; v1(-241.225,-184.888) R06.1@-241.006,-184.233 ; v1(-241.225,-184.888) R06.1@-241.006,-184.233 ; v1(-241.225,-184.888) R06.1@-241.2,-184.198 ; v1(-241.225,-184.888) R06.1@-241.006,-184.233 ; v1(-241.225,-184.888) R06.1@-241.2,-184.198 ; v1(-241.225,-184.888) R06.1@-241.2,-184.198 ; v1(-241.225,-184.888) R06.1@-241.005,-184.227 ; v1(-241.225,-184.888) R06.1@-241.005,-184.227 ; v1(-241.225,-184.888) R06.1@-241.005,-184.227 ; v1(-241.225,-184.888) R06.1@-241.2,-184.198 ; v1(-241.225,-184.888) R06.1@-241.005,-184.227 ; v1(-241.225,-184.888) R06.1@-241.2,-184.198 ; v1@-241.2,-184.863 R06.1@-241.2,-184.198 ; v1@-241.2,-184.863 R06.1@-241.005,-184.227 ; v1@-241.2,-184.863 R06.1@-241.005,-184.227 ; v1@-241.2,-184.863 R06.1@-241.005,-184.227 ; v1@-241.2,-184.863 R06.1@-241.2,-184.198 ; v1@-241.2,-184.863 R06.1@-241.005,-184.227 ; v1@-241.2,-184.863 R06.1@-241.2,-184.198
C0: ?.1@-215.013,-198.813 U1.25 | length 41
  Top Layer w0.203: -232.816,-189.395 U1.25@-232.4,-188.723 ; ?.1@-215.013,-196.023 -215.013,-194.935 ; U1.25@-232.4,-188.723 -232.4,-189.098 -233.148,-189.846 -233.148,-191.822 -232.311,-192.659 -225.986,-192.659 -224.231,-194.414 -215.533,-194.414 -215.013,-194.935 ; U1.25@-232.4,-188.723 -233.009,-189.706 U1.25@-232.4,-188.723 ; ?.1@-215.307,-195.815 -215.013,-194.935 ; ?.1@-215.307,-195.815 -215.013,-194.935 ; ?.1@-215.307,-195.815 -215.013,-194.935 ; ?.1@-215.307,-195.815 -215.013,-194.935 ; ?.1@-215.307,-195.815 -215.013,-194.935 ; ?.1@-215.013,-195.863 -215.013,-194.935 ; ?.1@-215.013,-195.863 -215.013,-194.935 ; ?.1@-215.013,-195.863 -215.013,-194.935 ; ?.1@-215.013,-195.863 -215.013,-194.935 ; ?.1@-215.013,-195.863 -215.013,-194.935 ; -215.013,-194.935 ?.1@-214.718,-195.815 ; -215.013,-194.935 ?.1@-214.718,-195.815 ; -215.013,-194.935 ?.1@-214.718,-195.815 ; -215.013,-194.935 ?.1@-214.718,-195.815 ; -215.013,-194.935 ?.1@-214.718,-195.815
C1: ?.1@-247.277,-198.813 U1.10 | length 64.3
  Top Layer w0.18: ?.1@-247.277,-198.813 -247.277,-194.521 -246.584,-193.828 -241.745,-193.828 -241.14,-193.223 -241.14,-192.185 -239.577,-190.623 -239.577,-186.532 -234.473,-181.428 -231.895,-181.428 -231.6,-181.723 U1.10@-231.6,-182.723 ; ?.1@-247.583,-195.812 -247.277,-194.923 ; ?.1@-247.583,-195.812 -247.277,-194.923 ; ?.1@-247.583,-195.812 -247.277,-194.923 ; ?.1@-247.583,-195.812 -247.277,-194.923 ; ?.1@-247.583,-195.812 -247.277,-194.923 ; ?.1@-247.583,-195.812 -247.277,-194.923 ; ?.1@-247.583,-195.812 -247.277,-194.923 ; ?.1@-247.407,-195.854 -247.277,-194.923 ; ?.1@-247.407,-195.854 -247.277,-194.923 ; ?.1@-247.407,-195.854 -247.277,-194.923 ; ?.1@-247.407,-195.854 -247.277,-194.923 ; ?.1@-247.407,-195.854 -247.277,-194.923 ; ?.1@-247.407,-195.854 -247.277,-194.923 ; ?.1@-247.407,-195.854 -247.277,-194.923 ; ?.1@-247.277,-195.863 -247.277,-194.923 ; ?.1@-247.277,-195.863 -247.277,-194.923 ; ?.1@-247.277,-195.863 -247.277,-194.923 ; ?.1@-247.277,-195.863 -247.277,-194.923 ; ?.1@-247.277,-195.863 -247.277,-194.923 ; ?.1@-247.277,-195.863 -247.277,-194.923 ; ?.1@-247.277,-195.863 -247.277,-194.923 ; -247.277,-194.923 ?.1@-246.972,-195.812 ; -247.277,-194.923 ?.1@-247.148,-195.854 ; -247.277,-194.923 ?.1@-246.972,-195.812 ; -247.277,-194.923 ?.1@-247.148,-195.854 ; -247.277,-194.923 ?.1@-246.972,-195.812 ; -247.277,-194.923 ?.1@-247.148,-195.854 ; -247.277,-194.923 ?.1@-246.972,-195.812 ; -247.277,-194.923 ?.1@-247.148,-195.854 ; -247.277,-194.923 ?.1@-246.972,-195.812 ; -247.277,-194.923 ?.1@-247.148,-195.854 ; -247.277,-194.923 ?.1@-246.972,-195.812 ; -247.277,-194.923 ?.1@-247.148,-195.854 ; -247.277,-194.923 ?.1@-246.972,-195.812 ; -247.277,-194.923 ?.1@-247.148,-195.854 ; U1.10@-231.6,-182.368 -231.6,-181.733 ; U1.10@-231.6,-182.368 -231.6,-181.733 ; U1.10@-231.6,-182.368 -231.6,-181.733
C2: ?.1@-245.468,-198.813 U1.11 | length 60.5
  Top Layer w0.18: ?.1@-245.468,-198.813 -245.468,-194.466 -245.19,-194.188 -241.596,-194.188 -240.78,-193.372 -240.78,-192.334 -239.217,-190.772 -239.217,-186.681 -234.324,-181.788 -232.126,-181.788 -232.008,-181.906 -232.008,-182.131 -232,-182.138 ; U1.11@-232,-182.723 -232,-182.138 ; ?.1@-245.774,-195.812 -245.468,-194.923 ; ?.1@-245.774,-195.812 -245.468,-194.923 ; ?.1@-245.774,-195.812 -245.468,-194.923 ; ?.1@-245.774,-195.812 -245.468,-194.923 ; ?.1@-245.774,-195.812 -245.468,-194.923 ; ?.1@-245.774,-195.812 -245.468,-194.923 ; ?.1@-245.774,-195.812 -245.468,-194.923 ; ?.1@-245.598,-195.854 -245.468,-194.923 ; ?.1@-245.598,-195.854 -245.468,-194.923 ; ?.1@-245.598,-195.854 -245.468,-194.923 ; ?.1@-245.598,-195.854 -245.468,-194.923 ; ?.1@-245.598,-195.854 -245.468,-194.923 ; ?.1@-245.598,-195.854 -245.468,-194.923 ; ?.1@-245.598,-195.854 -245.468,-194.923 ; ?.1@-245.468,-195.863 -245.468,-194.923 ; ?.1@-245.468,-195.863 -245.468,-194.923 ; ?.1@-245.468,-195.863 -245.468,-194.923 ; ?.1@-245.468,-195.863 -245.468,-194.923 ; ?.1@-245.468,-195.863 -245.468,-194.923 ; ?.1@-245.468,-195.863 -245.468,-194.923 ; ?.1@-245.468,-195.863 -245.468,-194.923 ; -245.468,-194.923 ?.1@-245.162,-195.812 ; -245.468,-194.923 ?.1@-245.338,-195.854 ; -245.468,-194.923 ?.1@-245.162,-195.812 ; -245.468,-194.923 ?.1@-245.338,-195.854 ; -245.468,-194.923 ?.1@-245.162,-195.812 ; -245.468,-194.923 ?.1@-245.338,-195.854 ; -245.468,-194.923 ?.1@-245.162,-195.812 ; -245.468,-194.923 ?.1@-245.338,-195.854 ; -245.468,-194.923 ?.1@-245.162,-195.812 ; -245.468,-194.923 ?.1@-245.338,-195.854 ; -245.468,-194.923 ?.1@-245.162,-195.812 ; -245.468,-194.923 ?.1@-245.338,-195.854 ; -245.468,-194.923 ?.1@-245.162,-195.812 ; -245.468,-194.923 ?.1@-245.338,-195.854 ; U1.11@-232,-182.368 -232,-182.138 ; U1.11@-232,-182.368 -232,-182.138 ; U1.11@-232,-182.368 -232,-182.138
C3: ?.1@-243.69,-198.794 U1.12 | length 57.8
  Top Layer w0.18: ?.1@-243.69,-198.794 -243.69,-194.918 ; U1.12@-232.4,-182.723 -232.4,-182.247 ; ?.1@-243.996,-195.792 -243.69,-194.918 ; ?.1@-243.996,-195.792 -243.69,-194.918 ; ?.1@-243.996,-195.792 -243.69,-194.918 ; ?.1@-243.996,-195.792 -243.69,-194.918 ; ?.1@-243.996,-195.792 -243.69,-194.918 ; ?.1@-243.996,-195.792 -243.69,-194.918 ; ?.1@-243.996,-195.792 -243.69,-194.918 ; ?.1@-243.82,-195.834 -243.69,-194.918 ; ?.1@-243.82,-195.834 -243.69,-194.918 ; ?.1@-243.82,-195.834 -243.69,-194.918 ; ?.1@-243.82,-195.834 -243.69,-194.918 ; ?.1@-243.82,-195.834 -243.69,-194.918 ; ?.1@-243.82,-195.834 -243.69,-194.918 ; ?.1@-243.82,-195.834 -243.69,-194.918 ; ?.1@-243.69,-195.844 -243.69,-194.918 ; ?.1@-243.69,-195.844 -243.69,-194.918 ; ?.1@-243.69,-195.844 -243.69,-194.918 ; ?.1@-243.69,-195.844 -243.69,-194.918 ; ?.1@-243.69,-195.844 -243.69,-194.918 ; ?.1@-243.69,-195.844 -243.69,-194.918 ; ?.1@-243.69,-195.844 -243.69,-194.918 ; -243.69,-194.918 -243.32,-194.548 -241.447,-194.548 -240.42,-193.521 -240.42,-192.484 -238.857,-190.921 -238.857,-186.83 -234.175,-182.148 -232.5,-182.148 ; -243.69,-194.918 ?.1@-243.384,-195.792 ; -243.69,-194.918 ?.1@-243.56,-195.834 ; -243.69,-194.918 ?.1@-243.384,-195.792 ; -243.69,-194.918 ?.1@-243.56,-195.834 ; -243.69,-194.918 ?.1@-243.384,-195.792 ; -243.69,-194.918 ?.1@-243.56,-195.834 ; -243.69,-194.918 ?.1@-243.384,-195.792 ; -243.69,-194.918 ?.1@-243.56,-195.834 ; -243.69,-194.918 ?.1@-243.384,-195.792 ; -243.69,-194.918 ?.1@-243.56,-195.834 ; -243.69,-194.918 ?.1@-243.384,-195.792 ; -243.69,-194.918 ?.1@-243.56,-195.834 ; -243.69,-194.918 ?.1@-243.384,-195.792 ; -243.69,-194.918 ?.1@-243.56,-195.834 ; -232.5,-182.148 -232.4,-182.247 ; -232.5,-182.148 U1.12@-232.4,-182.368 ; -232.5,-182.148 U1.12@-232.4,-182.368 ; -232.5,-182.148 U1.12@-232.4,-182.368 ; U1.12@-232.4,-182.368 -232.4,-182.247 ; U1.12@-232.4,-182.368 -232.4,-182.247 ; U1.12@-232.4,-182.368 -232.4,-182.247 ; U1.12@-232.4,-182.368 -232.4,-182.247 ; U1.12@-232.4,-182.368 -232.4,-182.247 ; U1.12@-232.4,-182.368 -232.4,-182.247
C4: ?.1@-241.885,-198.794 U1.13 | length 22.2
  Top Layer w0.18: ?.1@-242.185,-195.767 -241.885,-195.215 ; ?.1@-242.014,-195.83 -241.885,-195.215 ; ?.1@-241.885,-195.844 -241.885,-195.215 ; ?.1@-241.885,-195.823 -241.885,-195.215 ; ?.1@-241.756,-195.83 -241.885,-195.215 ; ?.1@-241.585,-195.767 -241.885,-195.215 ; U1.13@-233.2,-183.522 -235.007,-183.522 -238.497,-187.012 -238.497,-191.07 -240.06,-192.633 -240.06,-193.67 -241.325,-194.935 -241.605,-194.935 -241.885,-195.215 ; -234.19,-183.522 U1.13@-233.555,-183.522 ; -234.19,-183.522 U1.13@-233.555,-183.522 ; -234.19,-183.522 U1.13@-233.555,-183.522
C5: ?.1@-240.081,-198.813 U1.14 | length 53.5
  Top Layer w0.18: ?.1@-240.081,-198.813 -240.081,-194.303 -239.7,-193.922 -239.7,-192.782 -238.137,-191.219 -238.137,-187.162 -234.898,-183.923 U1.14@-233.2,-183.923 ; ?.1@-240.387,-195.812 -240.081,-194.923 ; ?.1@-240.387,-195.812 -240.081,-194.923 ; ?.1@-240.387,-195.812 -240.081,-194.923 ; ?.1@-240.387,-195.812 -240.081,-194.923 ; ?.1@-240.387,-195.812 -240.081,-194.923 ; ?.1@-240.387,-195.812 -240.081,-194.923 ; ?.1@-240.387,-195.812 -240.081,-194.923 ; ?.1@-240.21,-195.854 -240.081,-194.923 ; ?.1@-240.21,-195.854 -240.081,-194.923 ; ?.1@-240.21,-195.854 -240.081,-194.923 ; ?.1@-240.21,-195.854 -240.081,-194.923 ; ?.1@-240.21,-195.854 -240.081,-194.923 ; ?.1@-240.21,-195.854 -240.081,-194.923 ; ?.1@-240.21,-195.854 -240.081,-194.923 ; ?.1@-240.081,-195.863 -240.081,-194.923 ; ?.1@-240.081,-195.863 -240.081,-194.923 ; ?.1@-240.081,-195.863 -240.081,-194.923 ; ?.1@-240.081,-195.863 -240.081,-194.923 ; ?.1@-240.081,-195.863 -240.081,-194.923 ; ?.1@-240.081,-195.863 -240.081,-194.923 ; ?.1@-240.081,-195.863 -240.081,-194.923 ; -240.081,-194.923 ?.1@-239.775,-195.812 ; -240.081,-194.923 ?.1@-239.951,-195.854 ; -240.081,-194.923 ?.1@-239.775,-195.812 ; -240.081,-194.923 ?.1@-239.951,-195.854 ; -240.081,-194.923 ?.1@-239.775,-195.812 ; -240.081,-194.923 ?.1@-239.951,-195.854 ; -240.081,-194.923 ?.1@-239.775,-195.812 ; -240.081,-194.923 ?.1@-239.951,-195.854 ; -240.081,-194.923 ?.1@-239.775,-195.812 ; -240.081,-194.923 ?.1@-239.951,-195.854 ; -240.081,-194.923 ?.1@-239.775,-195.812 ; -240.081,-194.923 ?.1@-239.951,-195.854 ; -240.081,-194.923 ?.1@-239.775,-195.812 ; -240.081,-194.923 ?.1@-239.951,-195.854 ; -234.19,-183.923 U1.14@-233.555,-183.923 ; -234.19,-183.923 U1.14@-233.555,-183.923 ; -234.19,-183.923 U1.14@-233.555,-183.923